# Altium PCB level_Translator_v1.0.PcbDoc
Units mil, origin at the board's own origin, x right, y up, seen from the top; angles counter-clockwise.
Board outline 787.4 x 787.4 mil, 2 copper layers (Top Layer, Bottom Layer), stack 57 mil thick; 15 components, 6 nets, 38 pads, 6 vias.
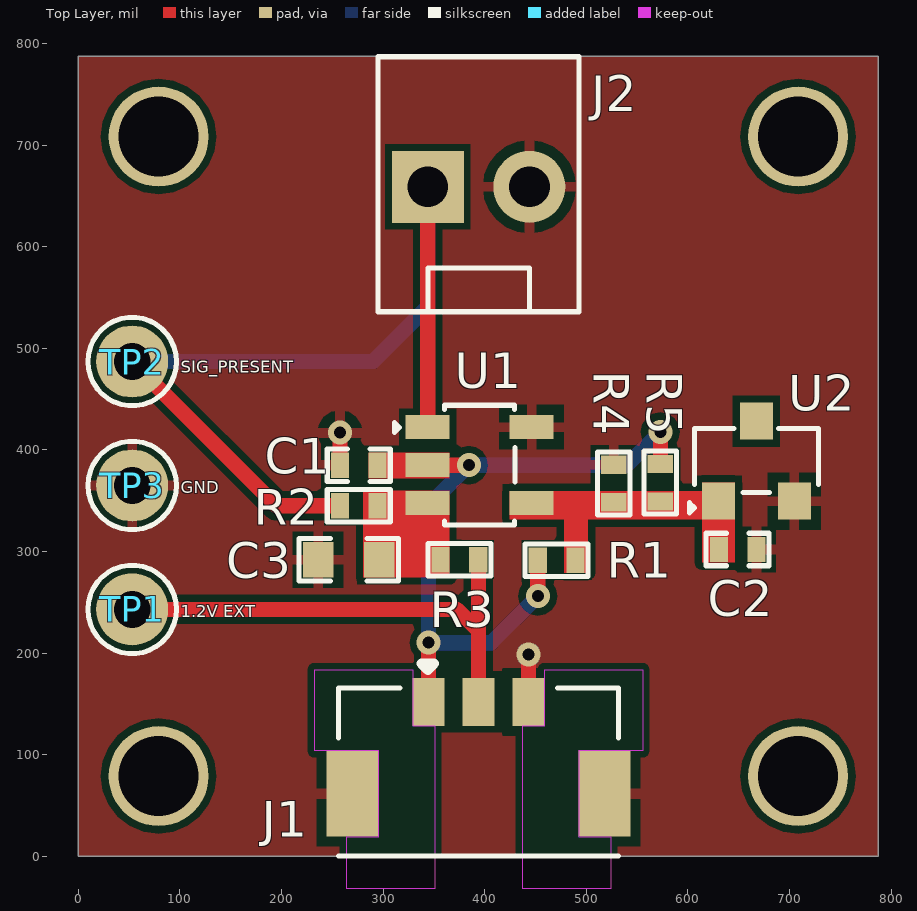
[diagram p0: Top Layer view]
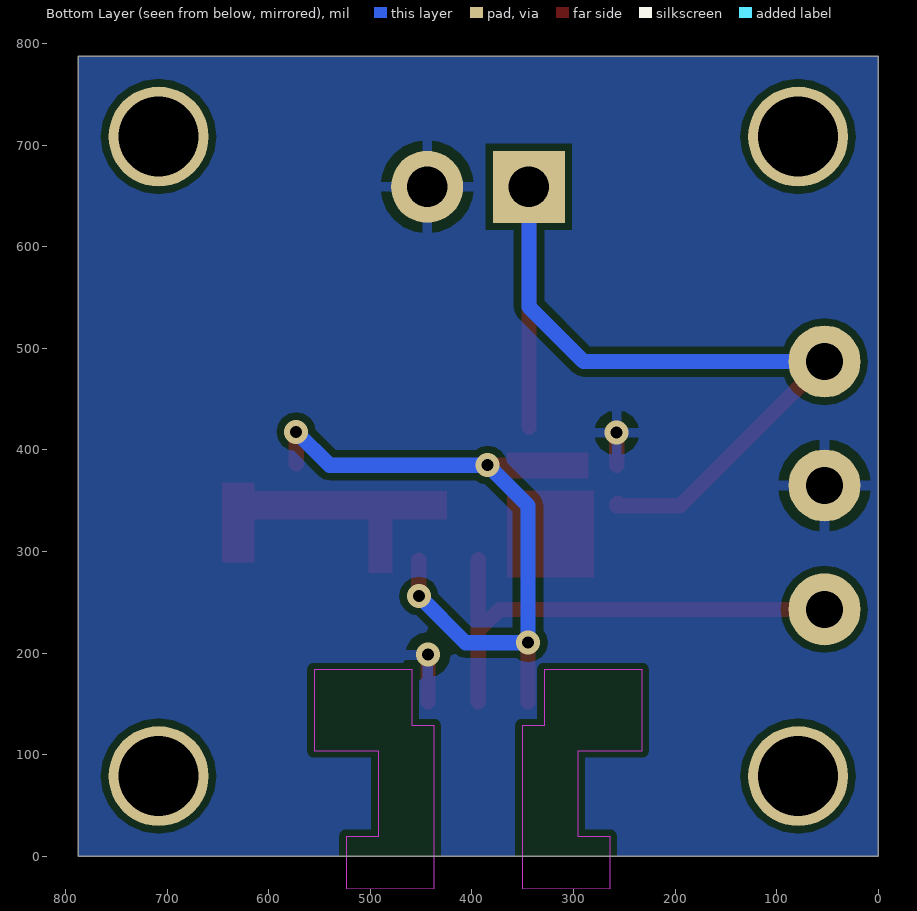
[diagram p1: Bottom Layer view, seen from below]
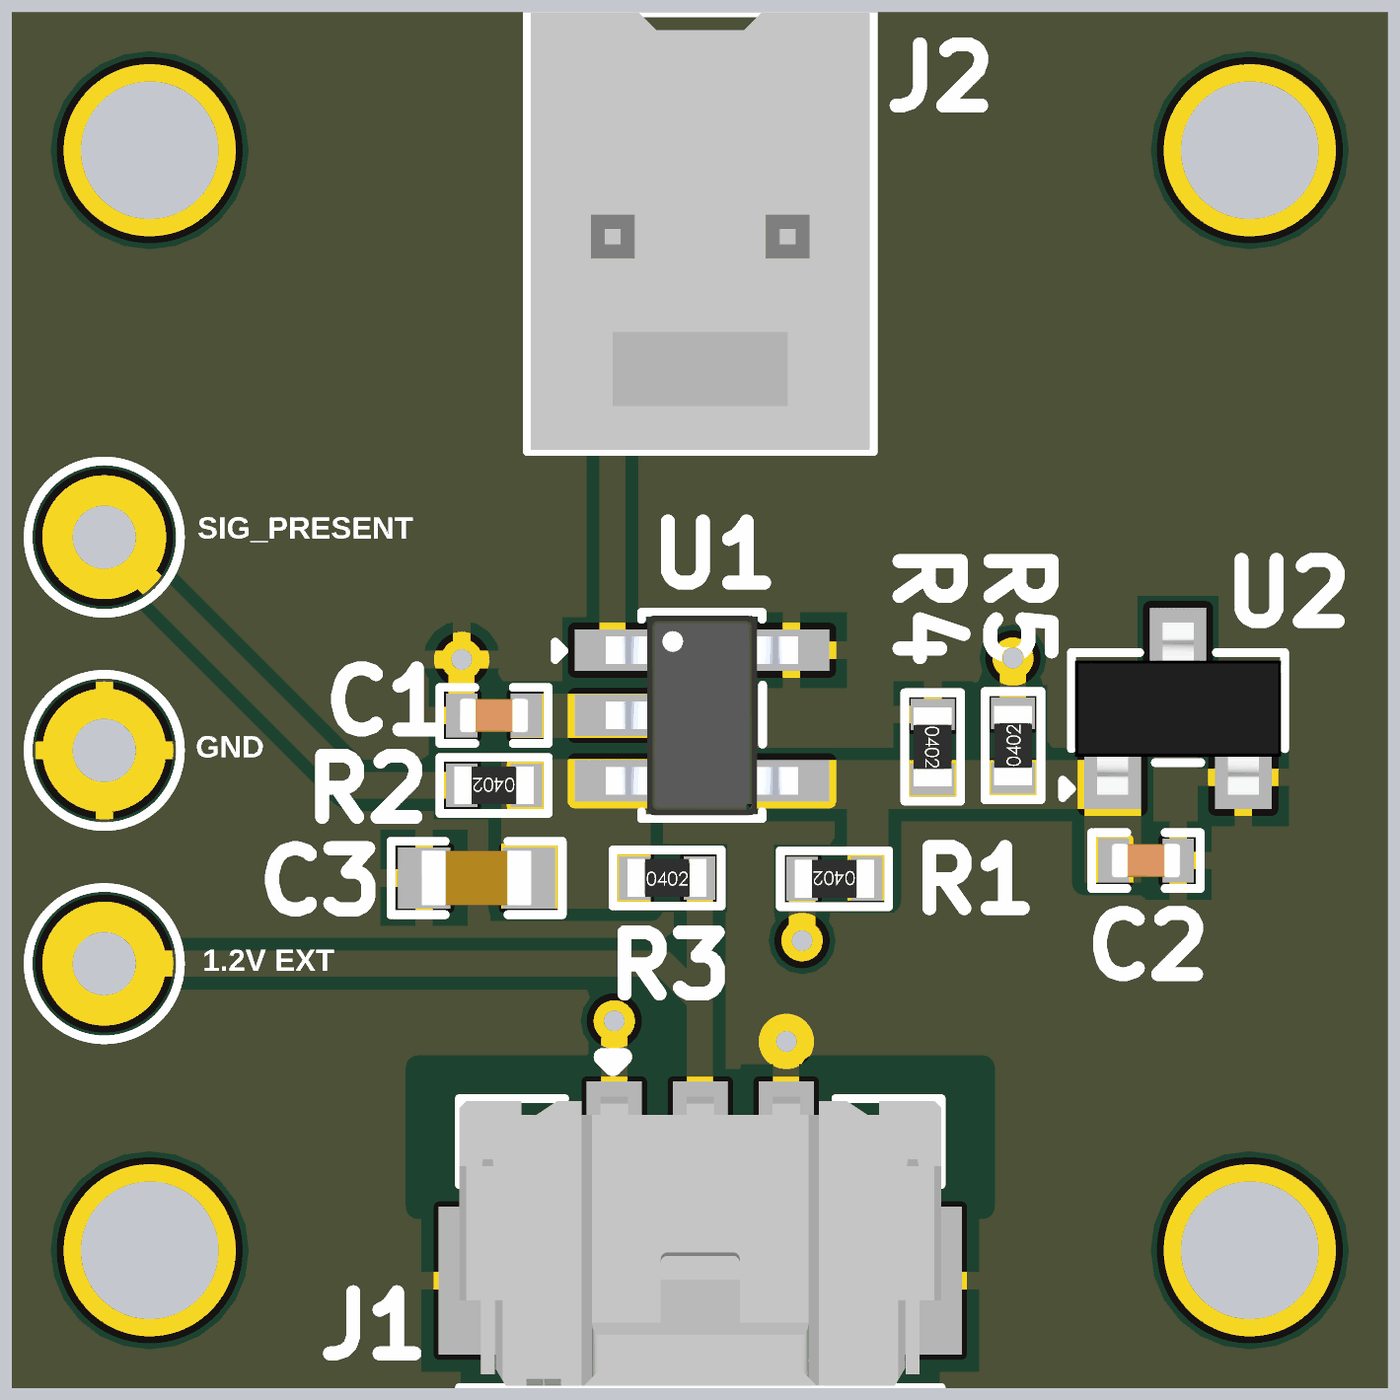
[diagram p2: 3D render of the assembled board from above, using the file's embedded part models]

## Layer stack, top to bottom
Top Solder: solder mask 3, Solder Resist, Dk 3.5
Top Layer: signal copper 10
Dielectric 1: dielectric 37, FR-4, Dk 4.8
Bottom Layer: signal copper 10
Bottom Solder: solder mask 3, Solder Resist, Dk 3.5

## Board outline
0,0 0,787.4 787.4,787.4 787.4,0

## Design rules (kind name [scope] priority, off if disabled: settings)
Clearance [All] p1: gap=7 ignorepadtopadclearanceinfootprint=FALSE except(4: Arc-SMDPad Track-SMDPad SMDPad-SMDPad)
ComponentClearance [All] p1: gap=0 collisioncheckmode=3 verticalgap=0 showdistances=FALSE
HoleSize [All] p1: absolutevalues=TRUE maxlimit=1000 minlimit=1 maxpercent=80.000 minpercent=20.000
HoleToHoleClearance [All] p1: gap=0 allowstackedmicrovias=TRUE
MinimumSolderMaskSliver [All] p1: minsoldermaskwidth=0
PolygonConnect [All] p1: connectstyle=Relief reliefconductorwidth=10 reliefentries=4 polygonreliefangle="90 Angle" airgapwidth=10
RoutingVias [All] p1: holewidth=11.81 width=23.62 viastyle="Through Hole" minholewidth=11.81 minwidth=23.62 maxholewidth=31.5 maxwidth=62.99
SilkToSilkClearance [All] p1: silktosilkclearance=0
SilkToSolderMaskClearance [IsPad] p1: minsilkscreentomaskgap=0 clearancetoexposedcopper=TRUE
SolderMaskExpansion [All] p1: expansion=4 istentingtop=FALSE
Width [All] p1: maxlimit=150 minlimit=8 preferedwidth=15 minimp=50.000000 maximp=50.000000 favimp=50.000000
24 further rules are at their usual default settings.

## Classes and differential pairs
component class LevelTranslator: C1 C2 C3 J1 J2 R1 R2 R3 R4 R5 TP1 TP3 U1 U2

## Components (designator, comment, footprint, x,y, rotation, side; value= is the part's Value field where it differs from the comment)
C1 "100nF" Cap-0402 276,385 r180 top
C2 "100nF" Cap-0402 649,302 r0 top
C3 "1uF" Cap-0603 266,292 r0 top
J1 "5055670381" 5055670381 394,106.82 r180 top locked
J2 "022232021" 022232021 394,659 r0 top locked
R1 "40K" Res-0402 470.76,291.6 r180 top
R2 "100K" Res-0402 276,345 r180 top
R3 "10K" Res-0402 375,292 r0 top
R4 "10K" Res-0402 527,367 r270 top
R5 "40K" Res-0402 572.92,367.74 r90 top
TP1 "0.5mm Test Pad" "0.5MM TEST PAD" 53,243 r0 top
TP2 "0.5mm Test Pad" "0.5MM TEST PAD" 53,487 r90 top
TP3 "0.5mm Test Pad" "0.5MM TEST PAD" 53,365 r90 top
U1 "MIC7221YM5-TR" SOT-23-5 395,385 r0 top
U2 "ADR510ARTZ-REEL7" SOT-23 667.36,389 r0 top

## Footprints (in the part's own frame and the unit in brackets; to place one, negate y for a bottom-side part, rotate by r counter-clockwise, add the part's x,y. Pads: shape width x height; smd on the part's side, far side on the other; paste and mask are expansions set on the pad)
"0.5MM TEST PAD" [mm]
  round 1.8 hole 0.92: 1(0,0)
022232021 [mm]
  rect 1.8x1.8 hole 1.02: 1(-1.27,0)
  round 1.8 hole 1.02: 2(1.27,0)
  silkscreen extent -2.51,-3.12 2.51,3.25, body extent -2.46,-3.1 2.46,3.25, height 10.88
5055670381 [mm]
  rect 0.8x1.2 smd mask+0.076: 1(1.25,-1.147) 2(0,-1.147) 3(-1.25,-1.147)
  rect 1.3x2.15 smd mask+0.076: S1(-3.15,1.148) S2(3.15,1.148)
  Keep-Out Layer region: -1.1,-0.547 -1.65,-0.547 -1.65,-1.947 -4.1,-1.947 -4.1,0.073 -2.5,0.073 -2.5,2.222 -3.3,2.222 -3.3,3.522 -1.1,3.522
  Keep-Out Layer region: 3.3,2.223 2.5,2.223 2.5,0.073 4.1,0.073 4.1,-1.947 1.65,-1.947 1.65,-0.547 1.1,-0.547 1.1,3.522 3.3,3.522
  silkscreen extent -3.5,-2.1 3.5,2.7, body extent -3.5,-1.52 3.5,2.68, height 3.91
Cap-0402 [mil]
  rect 18x25 smd mask+2.36: 1(-18.5,0) 2(18.5,0)
  silkscreen extent -31,-16 31,16, body extent -20,-10 20,10, height 19
Cap-0603 [mil]
  rect 30x35 smd mask+2.36: 1(-30,0) 2(30,0)
  silkscreen extent -49,-21 49,21, body extent -32,-16 31,16, height 34
Res-0402 [mil]
  rect 18x25 smd mask+2.17: 1(-18.5,0) 2(18.5,0)
  silkscreen extent -32,-17 32,16, body extent -23,-11 23,11, height 16
SOT-23 [mm] "TRANS NPN 40V 0.6A SOT23"
  rect 0.82x0.92 smd: 1(-0.95,-1) 2(0.95,-1) 3(0,1)
  silkscreen extent -1.68,-1.3 1.55,0.81, body extent -1.5,-1.25 1.5,1.25, height 1.05
SOT-23-5 [mm]
  rect 1.1x0.6 smd: 1(-1.3,0.95) 2(-1.3,0) 3(-1.3,-0.95) 4(1.3,-0.95) 5(1.3,0.95)
  silkscreen extent -2.13,-1.5 0.88,1.5, body extent -1.4,-1.45 1.4,1.45, height 1.45

## Part data
C1 C2: library part CC0402KRX5R8BB104, "CAP CER 0.1UF 25V X5R 0402", Case Code (Imperial)=0402, Case Code (Metric)=1005, Dielectric=X5R, LCSC Part Number=C106256, Manufacturer=Yageo, Max Operating Temperature=85°C, Min Operating Temperature=-55°C, Resistor Type=Ceramic, Supplier Part Number 1=311-1697-1-ND, Tolerance=10%, Voltage Rating=25V, Capacitance=100nF, Case/Package=0402, Category="Ceramic Capacitors", ComponentLink1Description=http://www.mouser.com/ds/2/447/UPY-GPHC_X5R_4V-to-50V_25-1131599.pdf?src-supplier=Mouser, ComponentLink1URL=http://www.mouser.com/ds/2/447/UPY-GPHC_X5R_4V-to-50V_25-1131599.pdf?src-supplier=Mouser, ComponentLink2Description=http://www.yageo.com/documents/recent/UPY-GPHC_X5R_4V-to-50V-16.pdf?src-supplier=Future+Electronics, ComponentLink2URL=http://www.yageo.com/documents/recent/UPY-GPHC_X5R_4V-to-50V-16.pdf?src-supplier=Future+Electronics, ComponentLink3Description=http://www.yageo.com/documents/recent/UPY-GPHC_X5R_4V-to-50V_25.pdf?src-supplier=Digi-Key, ComponentLink3URL=http://www.yageo.com/documents/recent/UPY-GPHC_X5R_4V-to-50V_25.pdf?src-supplier=Digi-Key, Depth=0.5mm, Halogen Free="Halogen Free", Item Type=Capacitor, Lead Free="Lead Free", Length=0.039inch, Manufacturer Part Number=CC0402KRX5R8BB104, Mount="Surface Mount", Packaging="Tape and Reel", Pricing 1="1=0.10000, 10=0.03800, 50=0.02100, 100=0.01710, 500=0.01224, 1000=0.00961, 2500=0.00874, 5000=0.00804 (USD)", RoHS=Yes, RoHS Compliant=Yes, Series=CC, Stock 1=4598218, Supplier 1=Digi-Key, Thickness=0.022inch, Voltage Rating (DC)=25V, Width=0.02inch
C3: library part CC0603KRX5R8BB105, "CAP CER 1UF 25V X5R 0603", Case Code (Imperial)=0603, Case Code (Metric)=1608, Dielectric=X5R, LCSC Part Number=C14664, Manufacturer=Yageo, Max Operating Temperature=85°C, Min Operating Temperature=-55°C, Package Quantity=1, Supplier Part Number 1=311-1445-1-ND, Tolerance=10%, Voltage Rating=25V, Capacitance=1uF, Case/Package=0603, Category="Ceramic Capacitors", ComponentLink1Description=https://datasheet.ciiva.com/176/mlccorderingcode-176785.pdf?src-supplier=Digi-Key, ComponentLink1URL=https://datasheet.ciiva.com/176/mlccorderingcode-176785.pdf?src-supplier=Digi-Key, ComponentLink2Description=https://datasheet.ciiva.com/176/mlccorderingcode-176786.pdf?src-supplier=Digi-Key, ComponentLink2URL=https://datasheet.ciiva.com/176/mlccorderingcode-176786.pdf?src-supplier=Digi-Key, ComponentLink3Description=https://datasheet.ciiva.com/176/mlccorderingcode-176787.pdf?src-supplier=Digi-Key, ComponentLink3URL=https://datasheet.ciiva.com/176/mlccorderingcode-176787.pdf?src-supplier=Digi-Key, ComponentLink4Description=https://datasheet.ciiva.com/17436/upy-gphc-x5r-4v-to-50v-12-17436952.pdf?src-supplier=Avnet+Europe, ComponentLink4URL=https://datasheet.ciiva.com/17436/upy-gphc-x5r-4v-to-50v-12-17436952.pdf?src-supplier=Avnet+Europe, ComponentLink5Description=https://datasheet.ciiva.com/7978/1525783-7978171.pdf?src-supplier=Element14, ComponentLink5URL=https://datasheet.ciiva.com/7978/1525783-7978171.pdf?src-supplier=Element14, ComponentLink6Description=https://datasheet.ciiva.com/11586/upy-gphc-x5r-4v-to-50v-12-11586318.pdf?src-supplier=Avnet, ComponentLink6URL=https://datasheet.ciiva.com/11586/upy-gphc-x5r-4v-to-50v-12-11586318.pdf?src-supplier=Avnet, Construction=Flat, Depth=0.8mm, Halogen Free="Halogen Free", Height=0.8mm, Item Type=Capacitor, Lead Free="Lead Free", Length=1.6mm, Manufacturer Part Number=CC0603KRX5R8BB105, Mount="Surface Mount", Number of Pins=2, Packaging="Tape and Reel", Pricing 1="1=0.12000, 10=0.08400, 50=0.04760, 100=0.03940, 500=0.02764, 1000=0.02288 (USD)", Radiation Hardening=No, REACH SVHC="No SVHC", RoHS=Yes, RoHS Compliant=Yes, Series=CC, Stock 1=919939, Supplier 1=Digi-Key, Termination=SMD/SMT, Thickness=0.035inch, Voltage Rating (DC)=25V, Width=0.031inch
J1: "CONN HEADER SMD R/A 3POS 1.25MM", Manufacturer=Molex, Supplier Part Number=538-505567-0381, ComponentLink1Description=http://www.literature.molex.com/SQLImages/kelmscott/Molex/PDF_Images/987651-4888.PDF?src-supplier=Digikey, ComponentLink1URL=http://www.literature.molex.com/SQLImages/kelmscott/Molex/PDF_Images/987651-4888.PDF?src-supplier=Digikey, Item Type="Headers and Wire Housings", Manufacturer Part Number=5055670381, Pricing="1=0.94, 10=0.784, 50=0.784, 100=0.653, 1000=0.65, 10000=0.501 (USD)", RoHS=Yes, Stock=6126, Supplier=Mouser
J2: "CONN HEADER VERT 2POS 2.54MM", Manufacturer=Molex, Supplier Part Number=538-22-23-2021, Category=Uncategorized, Manufacturer Part Number=022232021, Pricing="1=0.21, 10=0.127, 50=0.127, 100=0.096, 1000=0.086, 10000=0.073 (USD)", RoHS=No, Stock=51848, Supplier=Mouser
R1 R5: library part RNCF0402BTE40K0, "RES SMD 40K OHM 0.1% 1/10W 0402", Manufacturer="Stackpole Electronics", Supplier Part Number=738-RNCF0402BTE40K0CT-ND, ComponentLink1Description=http://datasheet.octopart.com/RNCF0402BTE40K0-Stackpole-Electronics-datasheet-12511394.pdf?src-supplier=Digikey, ComponentLink1URL=http://datasheet.octopart.com/RNCF0402BTE40K0-Stackpole-Electronics-datasheet-12511394.pdf?src-supplier=Digikey, ComponentLink2Description=http://datasheet.octopart.com/RNCF0402BTE40K0-Stackpole-Electronics-datasheet-12511394.pdf?src-supplier=NAC+Semi, ComponentLink2URL=http://datasheet.octopart.com/RNCF0402BTE40K0-Stackpole-Electronics-datasheet-12511394.pdf?src-supplier=NAC+Semi, ComponentLink3Description=https://datasheet.octopart.com/RNCF0402BTE40K0-Stackpole-Electronics-datasheet-154799225.pdf?src-supplier=Master+Electronics, ComponentLink3URL=https://datasheet.octopart.com/RNCF0402BTE40K0-Stackpole-Electronics-datasheet-154799225.pdf?src-supplier=Master+Electronics, Item Type="Chip SMD Resistors", Manufacturer Part Number=RNCF0402BTE40K0, Pricing="1=0.16, 10=0.12, 50=0.0946, 100=0.0846, 500=0.06416, 1000=0.05662, 5000=0.04184 (USD)", RoHS=Yes, Stock=8442, Supplier=Digikey
R2: library part RC0402FR-07100KL, "RES 100K OHM 1% 1/16W 0402", Case Code (Imperial)=0402, Case Code (Metric)=1005, LCSC Part Number=C60491, Manufacturer=Yageo, Max Operating Temperature=155°C, Max Power Dissipation=63mW, Min Operating Temperature=-55°C, Package Quantity=1, Resistance=100kR, Resistance Tolerance=1%, Resistor Type="Thick Film", Supplier Part Number 1=603-RC0402FR-07100KL, Temperature Coefficient=100ppm/°C, Voltage Rating=50V, Case/Package=0402, Category="Chip SMD Resistors", ComponentLink1Description=https://datasheet.ciiva.com/11819/0900766b80c66297-11819452.pdf?src-supplier=RSComponents, ComponentLink1URL=https://datasheet.ciiva.com/11819/0900766b80c66297-11819452.pdf?src-supplier=RSComponents, ComponentLink2Description=https://datasheet.ciiva.com/22747/1018594-22747509.pdf?src-supplier=Element14, ComponentLink2URL=https://datasheet.ciiva.com/22747/1018594-22747509.pdf?src-supplier=Element14, ComponentLink3Description=https://datasheet.ciiva.com/2453/pyu-r-int-thick-7-2453362.pdf?src-supplier=Digi-Key, ComponentLink3URL=https://datasheet.ciiva.com/2453/pyu-r-int-thick-7-2453362.pdf?src-supplier=Digi-Key, ComponentLink4Description=https://datasheet.ciiva.com/2453/pyu-r-int-thick-7-2453363.pdf?src-supplier=Digi-Key, ComponentLink4URL=https://datasheet.ciiva.com/2453/pyu-r-int-thick-7-2453363.pdf?src-supplier=Digi-Key, ComponentLink5Description=https://datasheet.ciiva.com/2453/pyu-r-int-thick-7-2453361.pdf?src-supplier=Digi-Key, ComponentLink5URL=https://datasheet.ciiva.com/2453/pyu-r-int-thick-7-2453361.pdf?src-supplier=Digi-Key, ComponentLink6Description=https://datasheet.ciiva.com/12667/pyu-rc0402-51-rohs-l-6-r-12667930.pdf?src-supplier=Mouser, ComponentLink6URL=https://datasheet.ciiva.com/12667/pyu-rc0402-51-rohs-l-6-r-12667930.pdf?src-supplier=Mouser, ComponentLink7Description=https://datasheet.ciiva.com/15189/getdatasheetpartid-323696-15189334.pdf?src-supplier=Verical, ComponentLink7URL=https://datasheet.ciiva.com/15189/getdatasheetpartid-323696-15189334.pdf?src-supplier=Verical, Construction=Rectangular, Depth=0.5mm, Features="Moisture Resistant", Height=0.016inch, Item Type=Resistor, Lead Free="Lead Free", Length=0.039inch, Manufacturer Part Number=RC0402FR-07100KL, Military Standard=Not, Number of Terminations=2, Packaging="Tape and Reel", Power Rating=63mW, Pricing 1="1=0.10000, 10=0.01200, 50=0.01200, 100=0.00500, 1000=0.00300, 2500=0.00200, 10000=0.00100 (USD)", REACH SVHC="No SVHC", RoHS=Yes, RoHS Compliant=Yes, Series=RC, Stock 1=7759549, Supplier 1=Mouser, Technology="THICK FILM", Termination=SMD/SMT, Tolerance=1%, Width=0.02inch, Working Voltage=50V
R3 R4: library part RC0402FR-0710KL, "RES 10K OHM 1% 1/16W 0402", Case Code (Imperial)=0402, Case Code (Metric)=1005, LCSC Part Number=C60490, Manufacturer=Yageo, Max Operating Temperature=155°C, Max Power Dissipation=63mW, Min Operating Temperature=-55°C, Power Rating=62.5mW, Resistance=10kR, Resistance Tolerance=1%, Resistor Type="Thick Film", Supplier Part Number 1=603-RC0402FR-0710KL, Temperature Coefficient=100ppm/°C, Voltage Rating=50V, Case/Package=0402, Category="Chip SMD Resistors", ComponentLink1Description=https://datasheet.ciiva.com/7660/38568-7660787.pdf?src-supplier=Element14, ComponentLink1URL=https://datasheet.ciiva.com/7660/38568-7660787.pdf?src-supplier=Element14, ComponentLink2Description=https://datasheet.ciiva.com/7849/1686128-7849814.pdf?src-supplier=Element14, ComponentLink2URL=https://datasheet.ciiva.com/7849/1686128-7849814.pdf?src-supplier=Element14, ComponentLink3Description=https://datasheet.ciiva.com/7983/1018594-7983486.pdf?src-supplier=Element14, ComponentLink3URL=https://datasheet.ciiva.com/7983/1018594-7983486.pdf?src-supplier=Element14, ComponentLink4Description=https://datasheet.ciiva.com/22747/1018594-22747512.pdf?src-supplier=Element14, ComponentLink4URL=https://datasheet.ciiva.com/22747/1018594-22747512.pdf?src-supplier=Element14, ComponentLink5Description=https://datasheet.ciiva.com/12667/pyu-rc0402-51-rohs-l-6-r-12667067.pdf?src-supplier=Mouser, ComponentLink5URL=https://datasheet.ciiva.com/12667/pyu-rc0402-51-rohs-l-6-r-12667067.pdf?src-supplier=Mouser, ComponentLink6Description=https://datasheet.ciiva.com/7849/1784430-7849813.pdf?src-supplier=Element14, ComponentLink6URL=https://datasheet.ciiva.com/7849/1784430-7849813.pdf?src-supplier=Element14, ComponentLink7Description=https://datasheet.ciiva.com/7849/1784430-7849815.pdf?src-supplier=Element14, ComponentLink7URL=https://datasheet.ciiva.com/7849/1784430-7849815.pdf?src-supplier=Element14, Construction=Rectangular, Depth=0.5mm, Features="Moisture Resistant", Height=0.32mm, Item Type=Resistor, Lead Free="Lead Free", Lead Pitch=0.2mm, Length=1mm, Manufacturer Part Number=RC0402FR-0710KL, Military Standard=Not, Number of Pins=2, Number of Terminations=2, Packaging="Tape and Reel", Pricing 1="1=0.10000, 10=0.01400, 50=0.01400, 100=0.00500, 1000=0.00300, 10000=0.00200 (USD)", REACH SVHC="No SVHC", RoHS=Yes, RoHS Compliant=Yes, Series=RC, Stock 1=18648329, Supplier 1=Mouser, Termination=SMD/SMT, Tolerance=1%, Voltage Rating (DC)=50V, Width=0.5mm, Working Voltage=50V
TP1 TP2 TP3: "Test pad"
U1: "IC COMPARATOR 1 GEN PUR SOT23-5", Manufacturer=Microchip, Supplier Part Number=576-2901-1-ND, Item Type=Comparators, Manufacturer Part Number=MIC7221YM5-TR, Pricing="1=0.37, 25=0.32, 100=0.3 (USD)", RoHS=Yes, Stock=26283, Supplier=Digikey
U2: "IC VREF SHUNT 0.35% SOT23-3", Manufacturer="Analog Devices", Supplier Part Number=584-ADR510ARTZ-R7, ComponentLink1Description=https://datasheet.ciiva.com/1172/81404-1172803.pdf?src-supplier=Element14, ComponentLink1URL=https://datasheet.ciiva.com/1172/81404-1172803.pdf?src-supplier=Element14, ComponentLink2Description=https://datasheet.ciiva.com/15373/adr510-279234-15373251.pdf?src-supplier=Mouser, ComponentLink2URL=https://datasheet.ciiva.com/15373/adr510-279234-15373251.pdf?src-supplier=Mouser, ComponentLink3Description=https://datasheet.ciiva.com/28474/81404-28474005.pdf?src-supplier=Element14, ComponentLink3URL=https://datasheet.ciiva.com/28474/81404-28474005.pdf?src-supplier=Element14, ComponentLink4Description=https://datasheet.ciiva.com/3235/adr510-3235758.pdf?src-supplier=Avnet, ComponentLink4URL=https://datasheet.ciiva.com/3235/adr510-3235758.pdf?src-supplier=Avnet, ComponentLink5Description=https://datasheet.ciiva.com/3235/adr510-3235291.pdf?src-supplier=Avnet, ComponentLink5URL=https://datasheet.ciiva.com/3235/adr510-3235291.pdf?src-supplier=Avnet, ComponentLink6Description=https://datasheet.ciiva.com/2005/adr510-2005628.pdf?src-supplier=Digikey, ComponentLink6URL=https://datasheet.ciiva.com/2005/adr510-2005628.pdf?src-supplier=Digikey, ComponentLink7Description=https://datasheet.ciiva.com/2005/adr510-2005629.pdf?src-supplier=Digikey, ComponentLink7URL=https://datasheet.ciiva.com/2005/adr510-2005629.pdf?src-supplier=Digikey, ComponentLink8Description=https://datasheet.ciiva.com/2005/adr510-2005630.pdf?src-supplier=Digikey, ComponentLink8URL=https://datasheet.ciiva.com/2005/adr510-2005630.pdf?src-supplier=Digikey, Item Type="Voltage References", Manufacturer Part Number=ADR510ARTZ-REEL7, Pricing="1=2.35, 10=2, 50=2, 100=1.69, 1000=1.14, 10000=1.03 (USD)", RoHS=Yes, Stock=28687, Supplier=Mouser

## Free pads (board coordinates)
  round 98.43 hole 78.74: MH1(79,708.4) MH2(708.4,708.4) MH3(708.4,79) MH4(79,79)

## Via types
v1: diameter 23.62, hole 11.81, Top Layer to Bottom Layer, 6 vias

## Nets (pads, with @x,y where several pads share a name; then routed paths per layer and width w, separated by ;. In a path a pad name is that pad's centre, name@x,y a point inside that pad or via, vN(x,y) a via of type N, cw(c..) or ccw(c..) an arc to the next point about the centre after c; other vN are vias at no path point)
+5V: C1.1 J1.1 R1.2 R5.2 U1.2 | length 685.7
  Top Layer w15: U1.2 v1(384.5,384.99) ; J1.1 v1(344.79,210.23) ; v1(452.26,256.14) R1.2 ; R5.2 v1(572.92,417.84)
  Bottom Layer w15: v1(452.26,256.14) 406.35,210.23 v1(344.79,210.23) 344.79,345.28 v1(384.5,384.99) 540.07,384.99 v1(572.92,417.84)
GND: C1.2 C2.2 C3.1 J1.3 J1.S1 J1.S2 J2.2 R4.1 TP3.1 U1.5 U2.2 | length 78.5
  Top Layer w15: C1.2 v1(257.5,417) ; J1.3 443.21,198.45 v1(443.26,198.5)
NetC2_1: C2.1 R1.1 R4.2 R5.1 U1.4 U2.1
NetC3_2: C3.2 R2.1 R3.1 U1.3
NetJ1_2: J1.2 R3.2 TP1.1 | length 489.7
  Top Layer w15: TP1.1 372.75,243 393.75,222 ; R3.2 393.75,291.75 393.75,222 ; J1.2 393.75,152.25 393.75,222
NetJ2_1: J2.1 R2.2 TP2.1 U1.1 | length 933.6
  Top Layer w15: TP2.1 195,345 R2.2 ; R2.2@256,347.6 R2.2@257.5,346.1 ; U1.1 343.82,658.82 J2.1
  Bottom Layer w15: TP2.1 290.21,487 343.82,540.61 343.82,658.82 J2.1
pads on no net: U2.3

## Polygon pours and split planes (outlines as drawn)
GND on Top Layer (solid, pour order 0): 0,0 0,787.4 787.4,787.4 787.4,0
GND on Bottom Layer (solid, pour order 1): 0,0 0,787.4 787.4,787.4 787.4,0

## Other copper
Top Layer:
  rectangle net NetC2_1: 478,279.1 501.76,359
  rectangle net NetC2_1: 613.82,289.28 646.1,367.74
  rectangle net NetC2_1: 424.53,331.52 646.1,359.41
  rectangle net +5V: 285.5,372 365.47,397.5
  rectangle net NetC3_2: 280,274.5 365.5,360
  rectangle net NetC3_2: 285.5,335.79 365.47,357.5

## Silkscreen, mask and mechanical layers (free items; w line width, h text height)
Top Overlay:
  circle w5: c53,243 r43.56
  circle w5: c53,487 r43.56
  circle w5: c53,365 r43.56
  text "SIG_PRESENT" at 100.87,472.11 h20
  text "GND" at 100.87,353.36 h20
  text "1.2V EXT" at 100.87,231.56 h20
Board Outline:
  the board outline again, w10

## Dimensions
787.4,787.4 to 787.4,0 on Board Outline
0,787.4 to 787.4,787.4 on Board Outline